# Altium PCB PCB1.PcbDoc (part 1 of 2)
Units mm, origin at the board's own origin, x right, y up, seen from the top; angles counter-clockwise.
Board outline 100.2 x 69.85 mm, 2 copper layers (Top Layer, Bottom Layer); 190 components, 160 nets, 546 pads, 233 vias.
Unrouted connection lines stored in the file: 15.
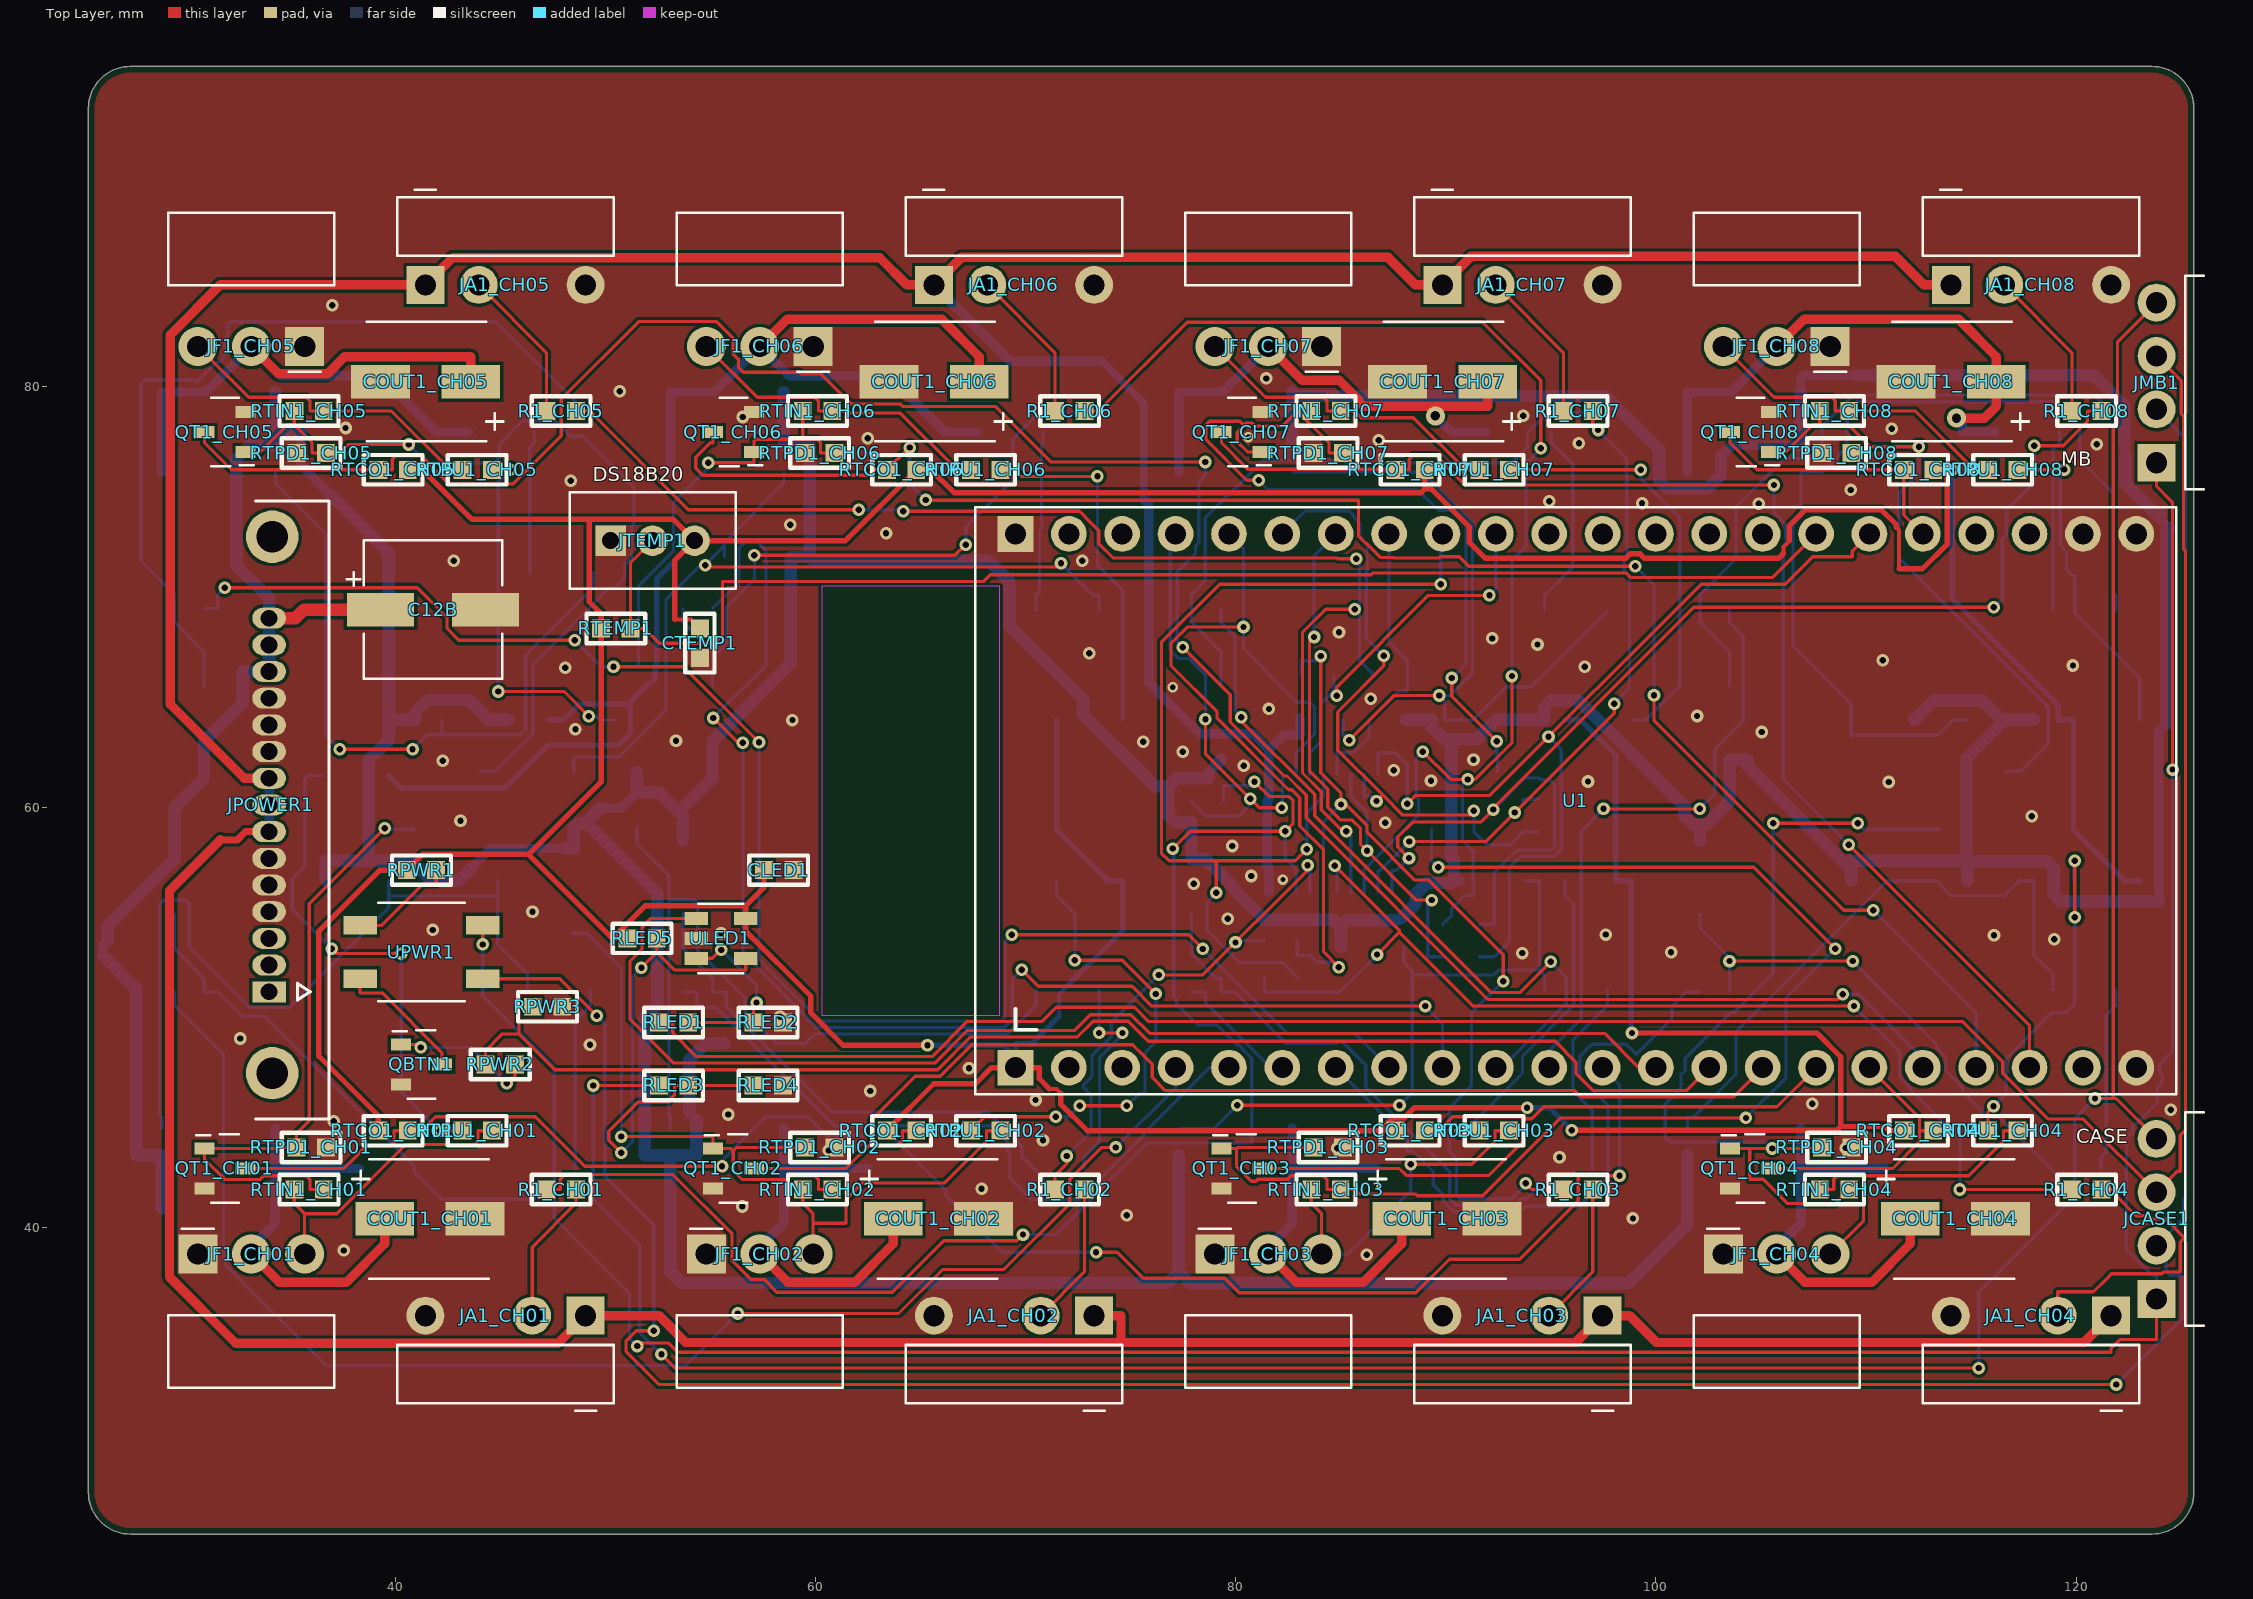
[diagram p0: Top Layer view]
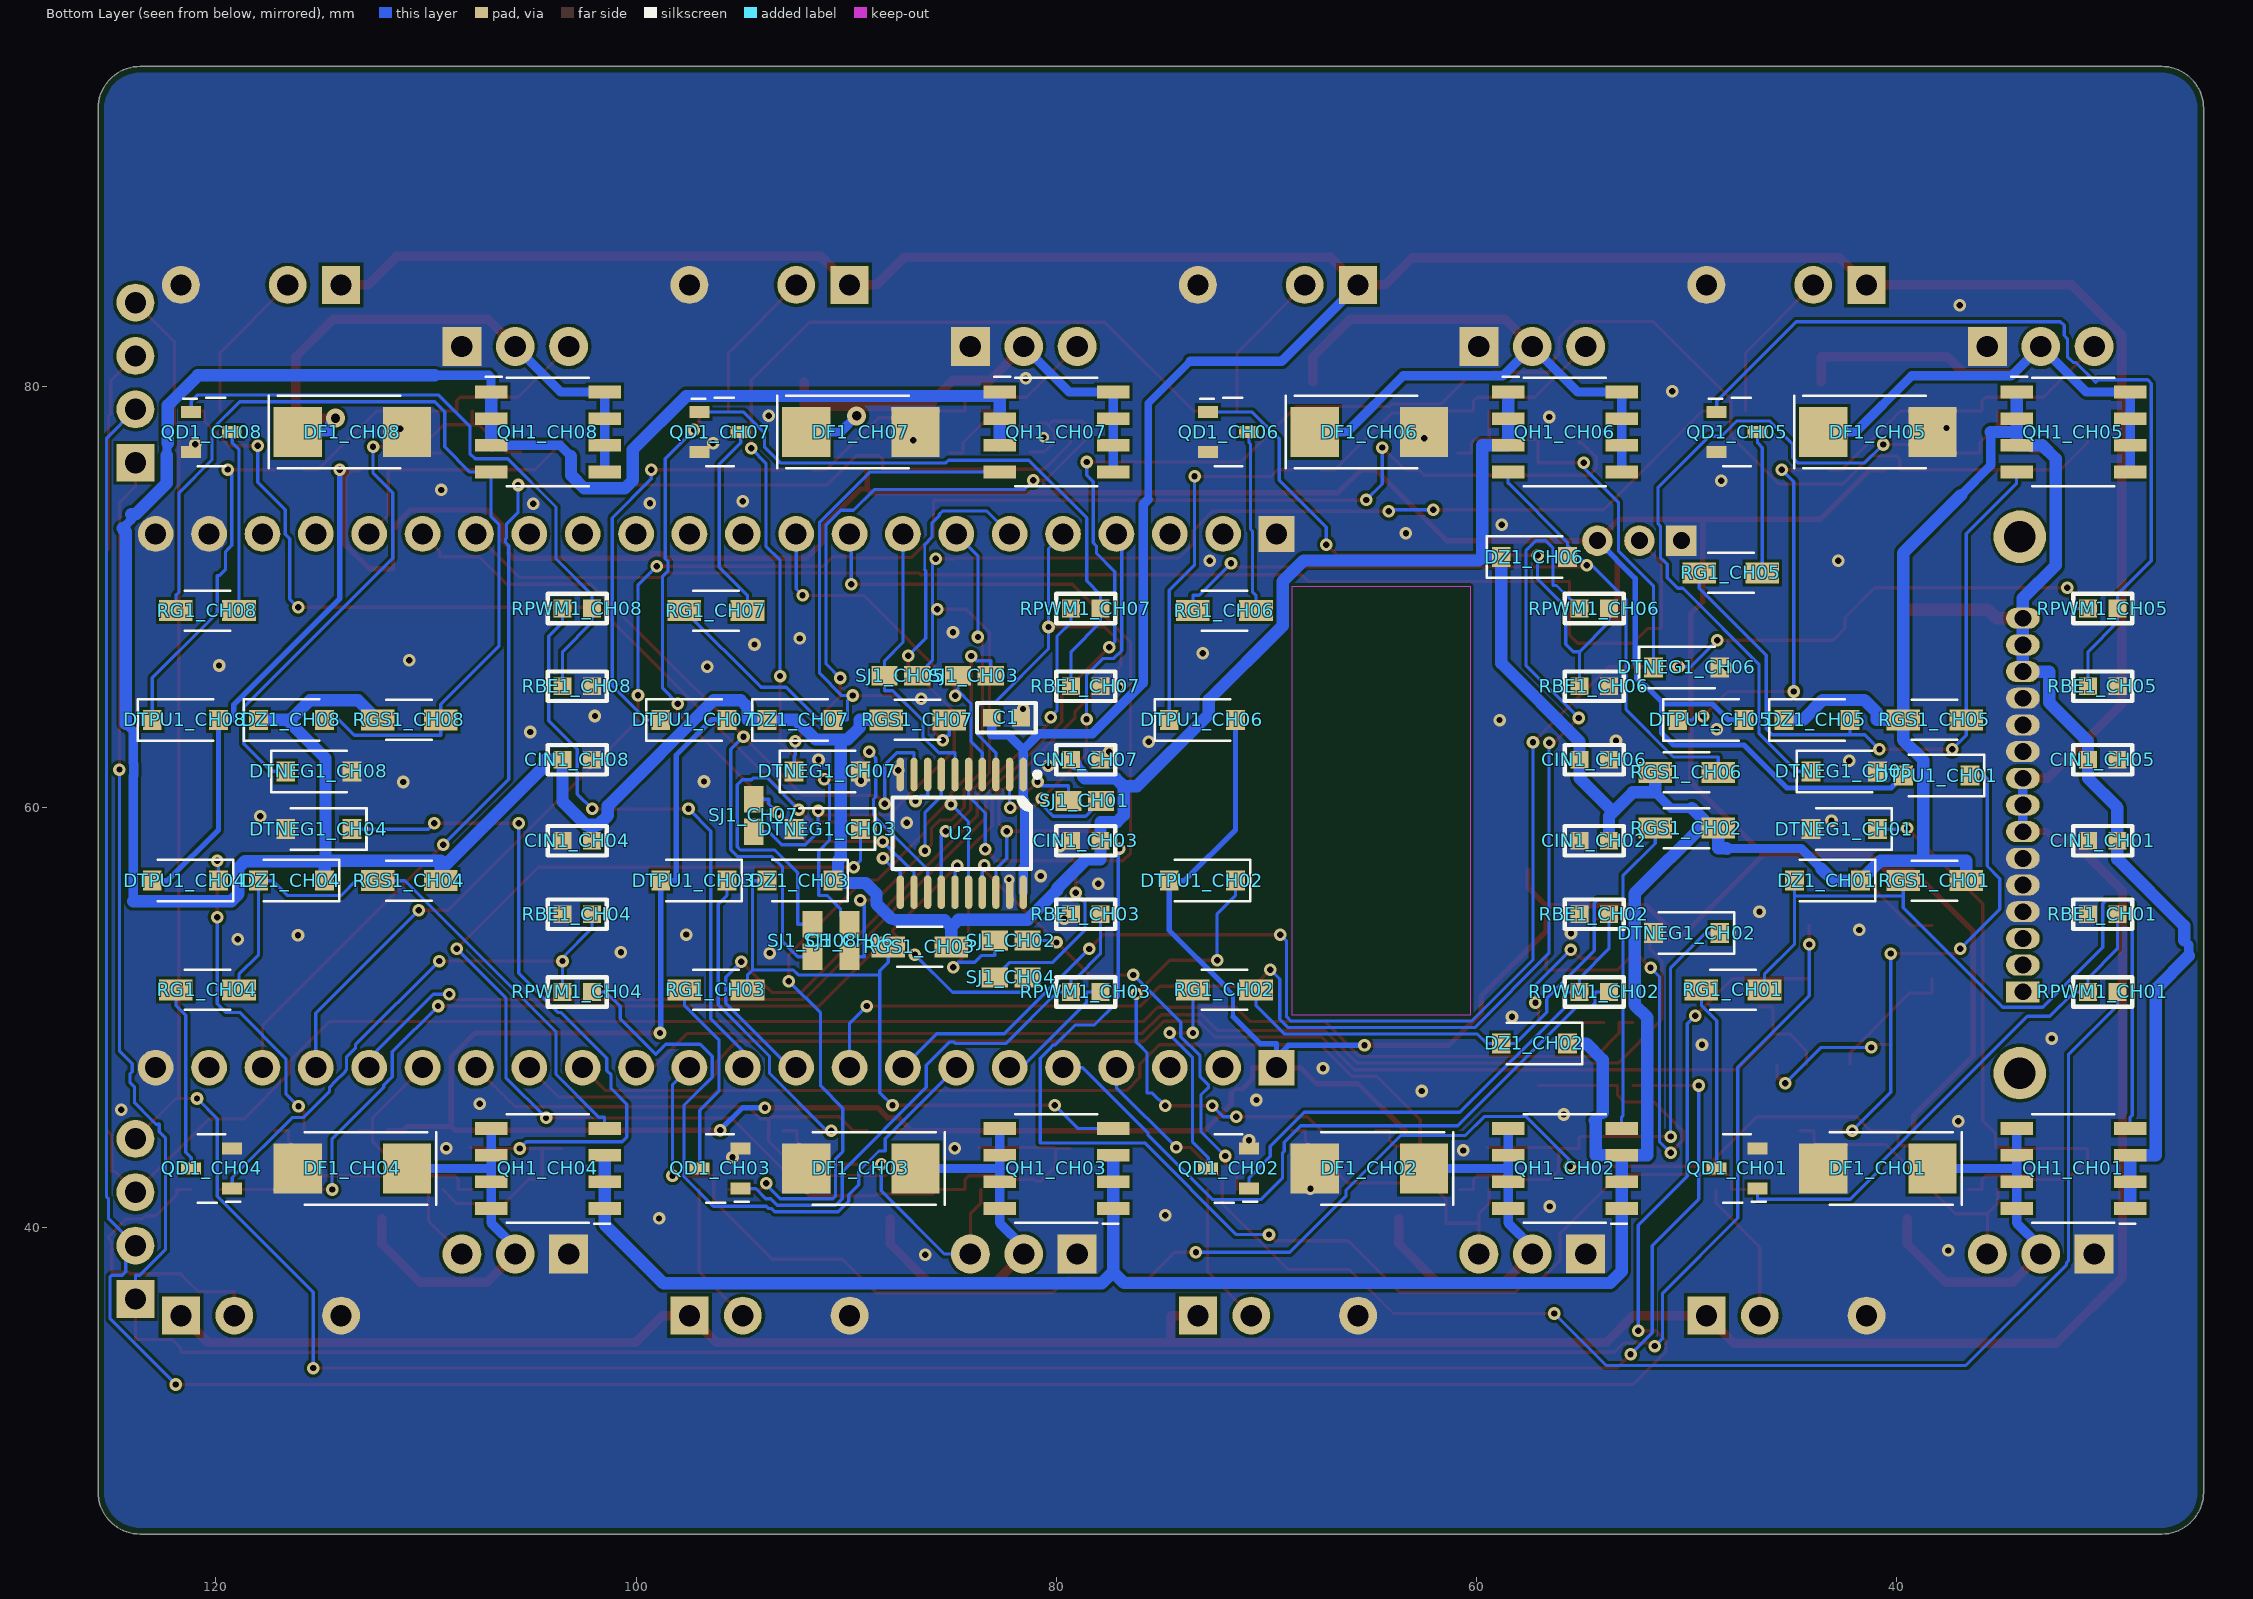
[diagram p1: Bottom Layer view, seen from below]
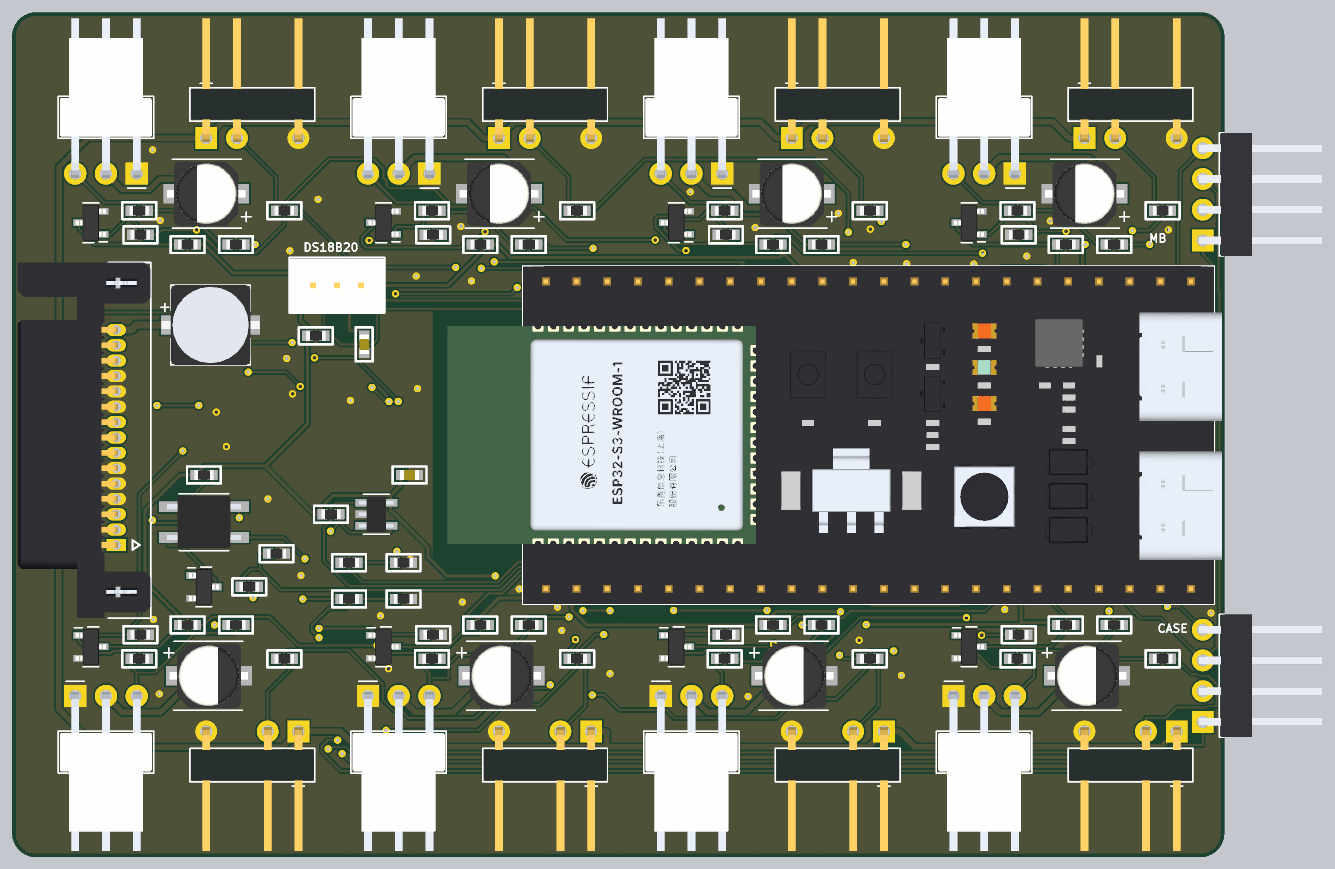
[diagram p3: 3D render of the assembled board from above, using the file's embedded part models]
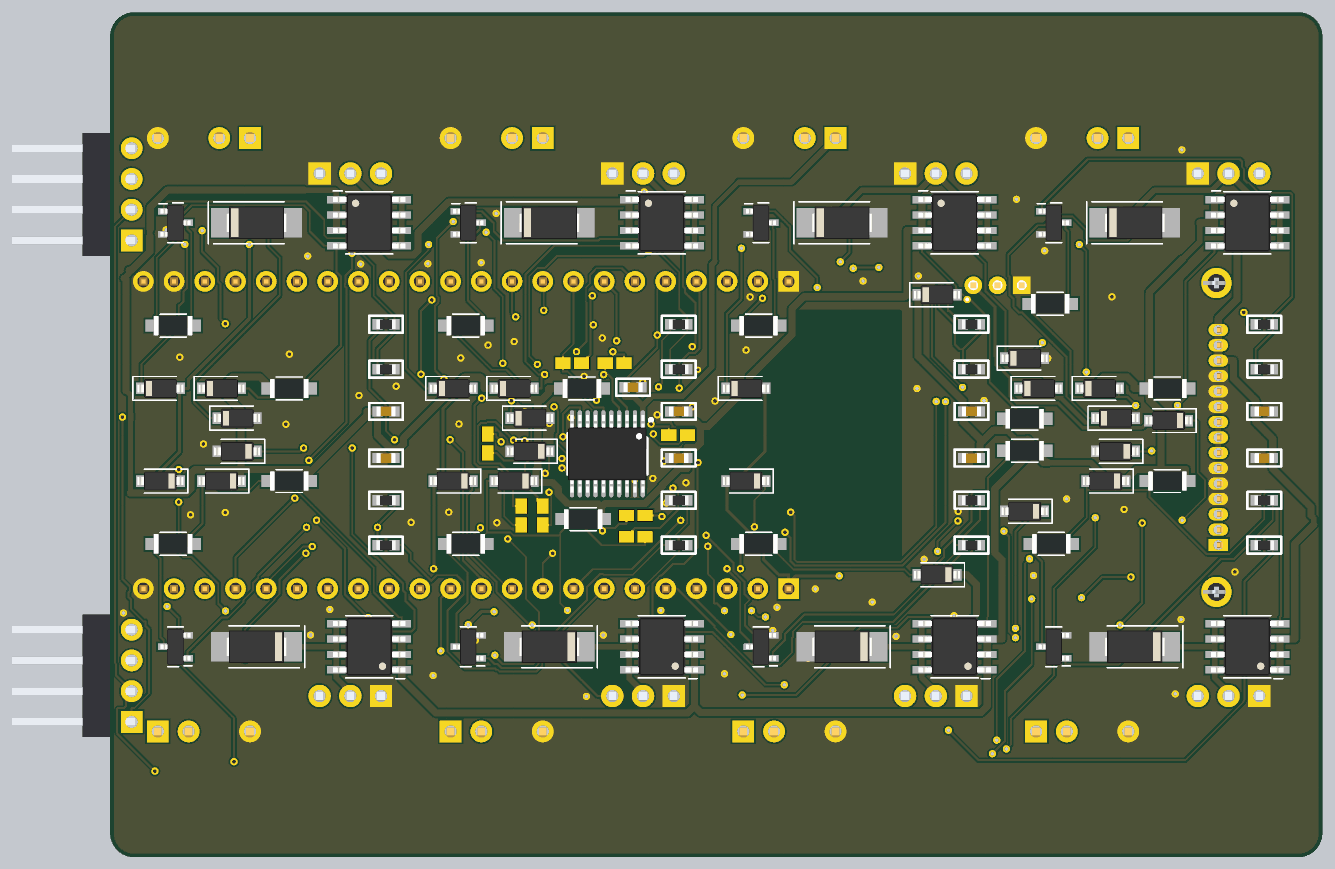
[diagram p4: 3D render of the assembled board from below, using the file's embedded part models]

## Layer stack, top to bottom
Top Solder: solder mask 0.0102, Solder Resist, Dk 3.5
Top Layer: signal copper 0.0356
Dielectric 1: dielectric 0.32, FR-4, Dk 4.8
Bottom Layer: signal copper 0.0356
Bottom Solder: solder mask 0.0102, Solder Resist, Dk 3.5

## Board outline
27.4,25.4 123.6,25.4 ccw(c123.6,27.4) 125.6,27.4 125.6,93.25 ccw(c123.6,93.25) 123.6,95.25 27.4,95.25 ccw(c27.4,93.25) 25.4,93.25 25.4,27.4 ccw(c27.4,27.4)

## Design rules (kind name [scope] priority, off if disabled: settings)
Clearance [All] p1: gap=0.152 ignorepadtopadclearanceinfootprint=FALSE
MinimumSolderMaskSliver [All] p1: minsoldermaskwidth=0.1
PolygonConnect [All] p1: connectstyle=Direct reliefconductorwidth=0.254 reliefentries=4 polygonreliefangle="90 Angle" airgapwidth=0.254
RoutingVias FrontIO_Vias [InNet('+3V3_AUX') Or InNet('PC_LED_VM') Or InNet('PC_LED_VP') Or InNet('PC_PLED_A') Or InNet('PC_PLED_K') Or InNet('PC_SW_A') Or InNet('PC_SW_B')] p1: holewidth=0.3 width=0.6 viastyle="Through Hole" minholewidth=0.25 minwidth=0.5 maxholewidth=0.45 maxwidth=0.9 // Through vias for front panel and temperature sense
RoutingVias [All] p2: holewidth=0.3 width=0.6 viastyle="Through Hole" minholewidth=0.25 minwidth=0.5 maxholewidth=0.45 maxwidth=0.9
SilkToSolderMaskClearance [IsPad] p1: minsilkscreentomaskgap=0.15 clearancetoexposedcopper=TRUE
SolderMaskExpansion [All] p1: expansion=0 istentingtop=FALSE
Width [All] p1: maxlimit=3 minlimit=0.115 preferedwidth=0.254 minimp=50.000000 maximp=50.000000 favimp=50.000000
28 further rules are at their usual default settings.

## Components (designator, comment, footprint, x,y, rotation, side; value= is the part's Value field where it differs from the comment)
C1 "100n / U2" CH0603C 82.375,64.25 r180 bottom
C12B "47u / 35V" EEE_FK_D_6X6 41.8,69.4 r0 top
CIN1_CH01 "100n / 50V" CH0603C 30.2,58.4 r0 bottom (schematic designator CIN1)
CIN1_CH02 "100n / 50V" CH0603C 54.4,58.4 r0 bottom (schematic designator CIN1)
CIN1_CH03 "100n / 50V" CH0603C 78.6,58.4 r0 bottom (schematic designator CIN1)
CIN1_CH04 "100n / 50V" CH0603C 102.8,58.4 r0 bottom (schematic designator CIN1)
CIN1_CH05 "100n / 50V" CH0603C 30.2,62.25 r180 bottom (schematic designator CIN1)
CIN1_CH06 "100n / 50V" CH0603C 54.4,62.25 r180 bottom (schematic designator CIN1)
CIN1_CH07 "100n / 50V" CH0603C 78.6,62.25 r180 bottom (schematic designator CIN1)
CIN1_CH08 "100n / 50V" CH0603C 102.8,62.25 r180 bottom (schematic designator CIN1)
CLED1 "100n" CH0603C 58.25,57 r0 top
COUT1_CH01 "10u/35V DNP" EEE_FK_5x5_8 41.655,40.4 r0 top (schematic designator COUT1)
COUT1_CH02 "10u/35V DNP" EEE_FK_5x5_8 65.855,40.4 r0 top (schematic designator COUT1)
COUT1_CH03 "10u/35V DNP" EEE_FK_5x5_8 90.055,40.4 r0 top (schematic designator COUT1)
COUT1_CH04 "10u/35V DNP" EEE_FK_5x5_8 114.255,40.4 r0 top (schematic designator COUT1)
COUT1_CH05 "10u/35V DNP" EEE_FK_5x5_8 41.445,80.25 r180 top (schematic designator COUT1)
COUT1_CH06 "10u/35V DNP" EEE_FK_5x5_8 65.645,80.25 r180 top (schematic designator COUT1)
COUT1_CH07 "10u/35V DNP" EEE_FK_5x5_8 89.845,80.25 r180 top (schematic designator COUT1)
COUT1_CH08 "10u/35V DNP" EEE_FK_5x5_8 114.045,80.25 r180 top (schematic designator COUT1)
CTEMP1 "100n" CH0603C 54.5,67.8 r270 top
DF1_CH01 "B340A-LS / SMA" B340ALS_DIODES_SMA 40.9,42.8 r0 bottom (schematic designator DF1)
DF1_CH02 "B340A-LS / SMA" B340ALS_DIODES_SMA 65.1,42.8 r0 bottom (schematic designator DF1)
DF1_CH03 "B340A-LS / SMA" B340ALS_DIODES_SMA 89.3,42.8 r0 bottom (schematic designator DF1)
DF1_CH04 "B340A-LS / SMA" B340ALS_DIODES_SMA 113.5,42.8 r0 bottom (schematic designator DF1)
DF1_CH05 "B340A-LS / SMA" B340ALS_DIODES_SMA 40.9,77.85 r180 bottom (schematic designator DF1)
DF1_CH06 "B340A-LS / SMA" B340ALS_DIODES_SMA 65.1,77.85 r180 bottom (schematic designator DF1)
DF1_CH07 "B340A-LS / SMA" B340ALS_DIODES_SMA 89.3,77.85 r180 bottom (schematic designator DF1)
DF1_CH08 "B340A-LS / SMA" B340ALS_DIODES_SMA 113.5,77.85 r180 bottom (schematic designator DF1)
DTNEG1_CH01 "1N4148W" D_SOD123_DIODESINC 42.5,58.95 r0 bottom (schematic designator DTNEG1)
DTNEG1_CH02 "1N4148W" D_SOD123_DIODESINC 50,54 r0 bottom (schematic designator DTNEG1)
DTNEG1_CH03 "1N4148W" D_SOD123_DIODESINC 90.9,58.95 r0 bottom (schematic designator DTNEG1)
DTNEG1_CH04 "1N4148W" D_SOD123_DIODESINC 115.1,58.95 r0 bottom (schematic designator DTNEG1)
DTNEG1_CH05 "1N4148W" D_SOD123_DIODESINC 42.5,61.7 r180 bottom (schematic designator DTNEG1)
DTNEG1_CH06 "1N4148W" D_SOD123_DIODESINC 50,66.65 r180 bottom (schematic designator DTNEG1)
DTNEG1_CH07 "1N4148W" D_SOD123_DIODESINC 90.9,61.7 r180 bottom (schematic designator DTNEG1)
DTNEG1_CH08 "1N4148W" D_SOD123_DIODESINC 115.1,61.7 r180 bottom (schematic designator DTNEG1)
DTPU1_CH01 "1N4148W" D_SOD123_DIODESINC 38.1,61.5 r0 bottom (schematic designator DTPU1)
DTPU1_CH02 "1N4148W" D_SOD123_DIODESINC 73.05,56.5 r0 bottom (schematic designator DTPU1)
DTPU1_CH03 "1N4148W" D_SOD123_DIODESINC 97.25,56.5 r0 bottom (schematic designator DTPU1)
DTPU1_CH04 "1N4148W" D_SOD123_DIODESINC 121.45,56.5 r0 bottom (schematic designator DTPU1)
DTPU1_CH05 "1N4148W" D_SOD123_DIODESINC 48.85,64.15 r180 bottom (schematic designator DTPU1)
DTPU1_CH06 "1N4148W" D_SOD123_DIODESINC 73.05,64.15 r180 bottom (schematic designator DTPU1)
DTPU1_CH07 "1N4148W" D_SOD123_DIODESINC 97.25,64.15 r180 bottom (schematic designator DTPU1)
DTPU1_CH08 "1N4148W" D_SOD123_DIODESINC 121.45,64.15 r180 bottom (schematic designator DTPU1)
DZ1_CH01 "BZT52C12" D_SOD123_DIODESINC 43.3,56.5 r0 bottom (schematic designator DZ1)
DZ1_CH02 "BZT52C12" D_SOD123_DIODESINC 57.25,48.75 r0 bottom (schematic designator DZ1)
DZ1_CH03 "BZT52C12" D_SOD123_DIODESINC 92.2,56.5 r0 bottom (schematic designator DZ1)
DZ1_CH04 "BZT52C12" D_SOD123_DIODESINC 116.4,56.5 r0 bottom (schematic designator DZ1)
DZ1_CH05 "BZT52C12" D_SOD123_DIODESINC 43.8,64.15 r180 bottom (schematic designator DZ1)
DZ1_CH06 "BZT52C12" D_SOD123_DIODESINC 57.25,71.9 r180 bottom (schematic designator DZ1)
DZ1_CH07 "BZT52C12" D_SOD123_DIODESINC 92.2,64.15 r180 bottom (schematic designator DZ1)
DZ1_CH08 "BZT52C12" D_SOD123_DIODESINC 116.4,64.15 r180 bottom (schematic designator DZ1)
JA1_CH01 "ARGB 5V / 1-2-x-4 RA" TSW_104_08_S_RA_003_ARGB 45.25,35.8 r0 top (schematic designator JA1)
JA1_CH02 "ARGB 5V / 1-2-x-4 RA" TSW_104_08_S_RA_003_ARGB 69.45,35.8 r0 top (schematic designator JA1)
JA1_CH03 "ARGB 5V / 1-2-x-4 RA" TSW_104_08_S_RA_003_ARGB 93.65,35.8 r0 top (schematic designator JA1)
JA1_CH04 "ARGB 5V / 1-2-x-4 RA" TSW_104_08_S_RA_003_ARGB 117.85,35.8 r0 top (schematic designator JA1)
JA1_CH05 "ARGB 5V / 1-2-x-4 RA" TSW_104_08_S_RA_003_ARGB 45.25,84.85 r180 top (schematic designator JA1)
JA1_CH06 "ARGB 5V / 1-2-x-4 RA" TSW_104_08_S_RA_003_ARGB 69.45,84.85 r180 top (schematic designator JA1)
JA1_CH07 "ARGB 5V / 1-2-x-4 RA" TSW_104_08_S_RA_003_ARGB 93.65,84.85 r180 top (schematic designator JA1)
JA1_CH08 "ARGB 5V / 1-2-x-4 RA" TSW_104_08_S_RA_003_ARGB 117.85,84.85 r180 top (schematic designator JA1)
JCASE1 "CASE FRONT PANEL" TSW_104_08_S_RA 123.825,40.4 r0 top
JF1_CH01 "FAN 12V / 3-pin RA" Molex_22053031_RA 33.15,38.73 r0 top (schematic designator JF1)
JF1_CH02 "FAN 12V / 3-pin RA" Molex_22053031_RA 57.35,38.73 r0 top (schematic designator JF1)
JF1_CH03 "FAN 12V / 3-pin RA" Molex_22053031_RA 81.55,38.73 r0 top (schematic designator JF1)
JF1_CH04 "FAN 12V / 3-pin RA" Molex_22053031_RA 105.75,38.73 r0 top (schematic designator JF1)
JF1_CH05 "FAN 12V / 3-pin RA" Molex_22053031_RA 33.15,81.92 r180 top (schematic designator JF1)
JF1_CH06 "FAN 12V / 3-pin RA" Molex_22053031_RA 57.35,81.92 r180 top (schematic designator JF1)
JF1_CH07 "FAN 12V / 3-pin RA" Molex_22053031_RA 81.55,81.92 r180 top (schematic designator JF1)
JF1_CH08 "FAN 12V / 3-pin RA" Molex_22053031_RA 105.75,81.92 r180 top (schematic designator JF1)
JMB1 "MOTHERBOARD F_PANEL" TSW_104_08_S_RA 123.825,80.2 r0 top
JPOWER1 "SATA POWER 15P - PSU input" CSAT-M15RD30-PB 34,60.1 r270 top
JTEMP1 "DS18B20" B3B_PH_K_S_1X03 52.25,72.68 r0 top
QBTN1 "MMBT3904" MMBT3904_SOT23 41.25,47.75 r0 top
QD1_CH01 "MMBT3904" MMBT3904_SOT23 47.6,42.8 r0 bottom (schematic designator QD1)
QD1_CH02 "MMBT3904" MMBT3904_SOT23 71.8,42.8 r0 bottom (schematic designator QD1)
QD1_CH03 "MMBT3904" MMBT3904_SOT23 96,42.8 r0 bottom (schematic designator QD1)
QD1_CH04 "MMBT3904" MMBT3904_SOT23 120.2,42.8 r0 bottom (schematic designator QD1)
QD1_CH05 "MMBT3904" MMBT3904_SOT23 47.6,77.85 r180 bottom (schematic designator QD1)
QD1_CH06 "MMBT3904" MMBT3904_SOT23 71.8,77.85 r180 bottom (schematic designator QD1)
QD1_CH07 "MMBT3904" MMBT3904_SOT23 96,77.85 r180 bottom (schematic designator QD1)
QD1_CH08 "MMBT3904" MMBT3904_SOT23 120.2,77.85 r180 bottom (schematic designator QD1)
QH1_CH01 "DMP6023LSS / SO-8" DMP6023LSS_SO8 31.6,42.8 r0 bottom (schematic designator QH1)
QH1_CH02 "DMP6023LSS / SO-8" DMP6023LSS_SO8 55.8,42.8 r0 bottom (schematic designator QH1)
QH1_CH03 "DMP6023LSS / SO-8" DMP6023LSS_SO8 80,42.8 r0 bottom (schematic designator QH1)
QH1_CH04 "DMP6023LSS / SO-8" DMP6023LSS_SO8 104.2,42.8 r0 bottom (schematic designator QH1)
QH1_CH05 "DMP6023LSS / SO-8" DMP6023LSS_SO8 31.6,77.85 r180 bottom (schematic designator QH1)
QH1_CH06 "DMP6023LSS / SO-8" DMP6023LSS_SO8 55.8,77.85 r180 bottom (schematic designator QH1)
QH1_CH07 "DMP6023LSS / SO-8" DMP6023LSS_SO8 80,77.85 r180 bottom (schematic designator QH1)
QH1_CH08 "DMP6023LSS / SO-8" DMP6023LSS_SO8 104.2,77.85 r180 bottom (schematic designator QH1)
QT1_CH01 "MMBT3904" MMBT3904_SOT23 31.9,42.8 r0 top (schematic designator QT1)
QT1_CH02 "MMBT3904" MMBT3904_SOT23 56.1,42.8 r0 top (schematic designator QT1)
QT1_CH03 "MMBT3904" MMBT3904_SOT23 80.3,42.8 r0 top (schematic designator QT1)
QT1_CH04 "MMBT3904" MMBT3904_SOT23 104.5,42.8 r0 top (schematic designator QT1)
QT1_CH05 "MMBT3904" MMBT3904_SOT23 31.9,77.85 r180 top (schematic designator QT1)
QT1_CH06 "MMBT3904" MMBT3904_SOT23 56.1,77.85 r180 top (schematic designator QT1)
QT1_CH07 "MMBT3904" MMBT3904_SOT23 80.3,77.85 r180 top (schematic designator QT1)
QT1_CH08 "MMBT3904" MMBT3904_SOT23 104.5,77.85 r180 top (schematic designator QT1)
R1_CH01 "330R candidate" CH0603R 47.9,41.8 r0 top (schematic designator R1)
R1_CH02 "330R candidate" CH0603R 72.1,41.8 r0 top (schematic designator R1)
R1_CH03 "330R candidate" CH0603R 96.3,41.8 r0 top (schematic designator R1)
R1_CH04 "330R candidate" CH0603R 120.5,41.8 r0 top (schematic designator R1)
R1_CH05 "330R candidate" CH0603R 47.9,78.85 r180 top (schematic designator R1)
R1_CH06 "330R candidate" CH0603R 72.1,78.85 r180 top (schematic designator R1)
R1_CH07 "330R candidate" CH0603R 96.3,78.85 r180 top (schematic designator R1)
R1_CH08 "330R candidate" CH0603R 120.5,78.85 r180 top (schematic designator R1)
RBE1_CH01 "100k" CH0603R 30.2,54.9 r0 bottom (schematic designator RBE1)
RBE1_CH02 "100k" CH0603R 54.4,54.9 r0 bottom (schematic designator RBE1)
RBE1_CH03 "100k" CH0603R 78.6,54.9 r0 bottom (schematic designator RBE1)
RBE1_CH04 "100k" CH0603R 102.8,54.9 r0 bottom (schematic designator RBE1)
RBE1_CH05 "100k" CH0603R 30.2,65.75 r180 bottom (schematic designator RBE1)
RBE1_CH06 "100k" CH0603R 54.4,65.75 r180 bottom (schematic designator RBE1)
RBE1_CH07 "100k" CH0603R 78.6,65.75 r180 bottom (schematic designator RBE1)
RBE1_CH08 "100k" CH0603R 102.8,65.75 r180 bottom (schematic designator RBE1)
RG1_CH01 "1k / 0.25W" CH1206R 47.8,51.3 r0 bottom (schematic designator RG1)
RG1_CH02 "1k / 0.25W" CH1206R 72,51.3 r0 bottom (schematic designator RG1)
RG1_CH03 "1k / 0.25W" CH1206R 96.2,51.3 r0 bottom (schematic designator RG1)
RG1_CH04 "1k / 0.25W" CH1206R 120.4,51.3 r0 bottom (schematic designator RG1)
RG1_CH05 "1k / 0.25W" CH1206R 47.9,71.15 r180 bottom (schematic designator RG1)
RG1_CH06 "1k / 0.25W" CH1206R 72,69.35 r180 bottom (schematic designator RG1)
RG1_CH07 "1k / 0.25W" CH1206R 96.2,69.35 r180 bottom (schematic designator RG1)
RG1_CH08 "1k / 0.25W" CH1206R 120.4,69.35 r180 bottom (schematic designator RG1)
RGS1_CH01 "10k / 0.25W" CH1206R 38.2,56.5 r0 bottom (schematic designator RGS1)
RGS1_CH02 "10k / 0.25W" CH1206R 50,59 r0 bottom (schematic designator RGS1)
RGS1_CH03 "10k / 0.25W" CH1206R 86.5,53.35 r0 bottom (schematic designator RGS1)
RGS1_CH04 "10k / 0.25W" CH1206R 110.8,56.5 r0 bottom (schematic designator RGS1)
RGS1_CH05 "10k / 0.25W" CH1206R 38.2,64.15 r180 bottom (schematic designator RGS1)
RGS1_CH06 "10k / 0.25W" CH1206R 50,61.65 r180 bottom (schematic designator RGS1)
RGS1_CH07 "10k / 0.25W" CH1206R 86.6,64.15 r180 bottom (schematic designator RGS1)
RGS1_CH08 "10k / 0.25W" CH1206R 110.8,64.15 r180 bottom (schematic designator RGS1)
RLED1 "330k 1%" CH0603R 53.25,49.75 r0 top
RLED2 "220k 1%" CH0603R 57.75,49.75 r0 top
RLED3 "330k 1%" CH0603R 53.25,46.75 r0 top
RLED4 "240k 1%" CH0603R 57.75,46.75 r0 top
RLED5 "2.2M 1%" CH0603R 51.75,53.75 r0 top
RPWM1_CH01 "1k" CH0603R 30.2,51.2 r0 bottom (schematic designator RPWM1)
RPWM1_CH02 "1k" CH0603R 54.4,51.2 r0 bottom (schematic designator RPWM1)
RPWM1_CH03 "1k" CH0603R 78.6,51.2 r0 bottom (schematic designator RPWM1)
RPWM1_CH04 "1k" CH0603R 102.8,51.2 r0 bottom (schematic designator RPWM1)
RPWM1_CH05 "1k" CH0603R 30.2,69.45 r180 bottom (schematic designator RPWM1)
RPWM1_CH06 "1k" CH0603R 54.4,69.45 r180 bottom (schematic designator RPWM1)
RPWM1_CH07 "1k" CH0603R 78.6,69.45 r180 bottom (schematic designator RPWM1)
RPWM1_CH08 "1k" CH0603R 102.8,69.45 r180 bottom (schematic designator RPWM1)
RPWR1 "220R" CH0603R 41.25,57 r0 top
RPWR2 "3.3k" CH0603R 45,47.75 r0 top
RPWR3 "100k" CH0603R 47.25,50.5 r0 top
RTCO1_CH01 "47k" CH0603R 39.9,44.6 r0 top (schematic designator RTCO1)
RTCO1_CH02 "47k" CH0603R 64.1,44.6 r0 top (schematic designator RTCO1)
RTCO1_CH03 "47k" CH0603R 88.3,44.6 r0 top (schematic designator RTCO1)
RTCO1_CH04 "47k" CH0603R 112.5,44.6 r0 top (schematic designator RTCO1)
RTCO1_CH05 "47k" CH0603R 39.9,76.05 r180 top (schematic designator RTCO1)
RTCO1_CH06 "47k" CH0603R 64.1,76.05 r180 top (schematic designator RTCO1)
RTCO1_CH07 "47k" CH0603R 88.3,76.05 r180 top (schematic designator RTCO1)
RTCO1_CH08 "47k" CH0603R 112.5,76.05 r180 top (schematic designator RTCO1)
RTEMP1 "4.7k" CH0603R 50.5,68.5 r0 top
RTIN1_CH01 "47k" CH0603R 35.9,41.8 r0 top (schematic designator RTIN1)
RTIN1_CH02 "47k" CH0603R 60.1,41.8 r0 top (schematic designator RTIN1)
RTIN1_CH03 "47k" CH0603R 84.3,41.8 r0 top (schematic designator RTIN1)
RTIN1_CH04 "47k" CH0603R 108.5,41.8 r0 top (schematic designator RTIN1)
RTIN1_CH05 "47k" CH0603R 35.9,78.85 r180 top (schematic designator RTIN1)
RTIN1_CH06 "47k" CH0603R 60.1,78.85 r180 top (schematic designator RTIN1)
RTIN1_CH07 "47k" CH0603R 84.3,78.85 r180 top (schematic designator RTIN1)
RTIN1_CH08 "47k" CH0603R 108.5,78.85 r180 top (schematic designator RTIN1)
RTPD1_CH01 "100k" CH0603R 36,43.8 r0 top (schematic designator RTPD1)
RTPD1_CH02 "100k" CH0603R 60.2,43.8 r0 top (schematic designator RTPD1)
RTPD1_CH03 "100k" CH0603R 84.4,43.8 r0 top (schematic designator RTPD1)
RTPD1_CH04 "100k" CH0603R 108.6,43.8 r0 top (schematic designator RTPD1)
RTPD1_CH05 "100k" CH0603R 36,76.85 r180 top (schematic designator RTPD1)
RTPD1_CH06 "100k" CH0603R 60.2,76.85 r180 top (schematic designator RTPD1)
RTPD1_CH07 "100k" CH0603R 84.4,76.85 r180 top (schematic designator RTPD1)
RTPD1_CH08 "100k" CH0603R 108.6,76.85 r180 top (schematic designator RTPD1)
RTPU1_CH01 "10k DNP" CH0603R 43.9,44.6 r0 top (schematic designator RTPU1)
RTPU1_CH02 "10k DNP" CH0603R 68.1,44.6 r0 top (schematic designator RTPU1)
RTPU1_CH03 "10k DNP" CH0603R 92.3,44.6 r0 top (schematic designator RTPU1)
RTPU1_CH04 "10k DNP" CH0603R 116.5,44.6 r0 top (schematic designator RTPU1)
RTPU1_CH05 "10k DNP" CH0603R 43.9,76.05 r180 top (schematic designator RTPU1)
RTPU1_CH06 "10k DNP" CH0603R 68.1,76.05 r180 top (schematic designator RTPU1)
RTPU1_CH07 "10k DNP" CH0603R 92.3,76.05 r180 top (schematic designator RTPU1)
RTPU1_CH08 "10k DNP" CH0603R 116.5,76.05 r180 top (schematic designator RTPU1)
SJ1_CH01 "OPEN" SJ_RECT_125X095_G030 78.65,60.3 r0 bottom (schematic designator SJ1)
SJ1_CH02 "OPEN" SJ_RECT_125X095_G030 82.15,53.65 r180 bottom (schematic designator SJ1)
SJ1_CH03 "OPEN" SJ_RECT_125X095_G030 83.9,66.25 r180 bottom (schematic designator SJ1)
SJ1_CH04 "OPEN" SJ_RECT_125X095_G030 82.15,51.9 r180 bottom (schematic designator SJ1)
SJ1_CH05 "OPEN" SJ_RECT_125X095_G030 87.4,66.25 r180 bottom (schematic designator SJ1)
SJ1_CH06 "OPEN" SJ_RECT_125X095_G030 89.85,53.65 r90 bottom (schematic designator SJ1)
SJ1_CH07 "OPEN" SJ_RECT_125X095_G030 94.4,59.6 r90 bottom (schematic designator SJ1)
SJ1_CH08 "OPEN" SJ_RECT_125X095_G030 91.6,53.65 r90 bottom (schematic designator SJ1)
U1 "ESP32-S3 DEVBOARD - UNVERIFIED" YD-ESP32-S3_44P_25.40MM 96.191,60.3 r90 top
U2 "SN74AHCT245 OPTIONAL / DNP" "TI TSSOP-20 PW" 84.5,58.75 r270 bottom
ULED1 "MCP6541T-I/OT" SOT23_5_AUX 55.5,53.75 r0 top
UPWR1 "AQY212GS" AQY212GS_SOP4 41.25,53.1 r0 top

## Footprints (in the part's own frame and the unit in brackets; to place one, negate y for a bottom-side part, rotate by r counter-clockwise, add the part's x,y. Pads: shape width x height; smd on the part's side, far side on the other; paste and mask are expansions set on the pad)
AQY212GS_SOP4 [mm] "Panasonic AQY212GS, four leads"
  rect 1.6x0.88 smd: 1(-2.92,1.27) 2(-2.92,-1.27) 3(2.92,-1.27) 4(2.92,1.27)
  silkscreen extent -2.05,-2.35 2.05,2.35, body extent -3.05,-2.15 3.05,2.15, height 2.19
B3B_PH_K_S_1X03 [mm] "JST PH 2 mm vertical, B3B-PH-K-S"
  rect 1.45x1.45 hole 0.8: 1(-2,0)
  round 1.45 hole 0.8: 2(0,0) 3(2,0)
  silkscreen extent -3.95,-2.3 3.95,2.3, body extent -3.95,-2.3 3.95,2.2, height 6
B340ALS_DIODES_SMA [mm] "Diodes Inc B340A-LS 40V 3A SMA Schottky, K1 A2"
  rect 2.3x2.4 smd: 1(-2.6,0) 2(2.6,0)
  silkscreen extent -3.98,-1.73 2.28,1.73, body extent -2.5,-1.35 2.5,1.35, height 2.22
CH0603C [mm] "Chip Capacitor, 2-Leads, Body 1,53x0,85mm, IPC Medium Density"
  rect 0.85x0.85 smd: 1(-0.7,0) 2(0.7,0)
  silkscreen extent -1.4,-0.7 1.4,0.7, body extent -0.8,-0.4 0.8,0.4, height 0.9
CH0603R [mm]
  rect 0.85x0.85 smd: 1(-0.7,0) 2(0.7,0)
  silkscreen extent -1.4,-0.7 1.4,0.7, body extent -0.8,-0.4 0.8,0.4, height 0.4
CH1206R [mm] "1206 resistor, existing NotOnlyFans CH1206R land"
  rect 1.6x1 smd: 1(-1.5,0) 2(1.5,0)
  silkscreen extent -1.08,-0.95 1.08,0.95, body extent -1.6,-0.8 1.6,0.8, height 0.55
CSAT-M15RD30-PB [mm] "Conn-Link SATA Power 15P male RA DIP; drawing CSAT-M07-H0B Rev A, PCB 1.60 mm"
  rect 1x1.6 hole 0.8: 1(8.89,0)
  oval 1x1.6 hole 0.8: 2(7.62,0) 3(6.35,0) 4(5.08,0) 5(3.81,0) 6(2.54,0) 7(1.27,0) 8(0,0) 9(-1.27,0) 10(-2.54,0) 11(-3.81,0) 12(-5.08,0) 13(-6.35,0) 14(-7.62,0) 15(-8.89,0)
  round 2.5 hole 1.5: MP1(12.765,0.15) MP2(-12.765,0.15)
  silkscreen extent -14.46,-0.65 14.93,2.85, body extent -14.47,-8.16 14.93,2.85, height 4
D_SOD123_DIODESINC [mm] "Diodes Incorporated SOD-123; cathode pad 1"
  rect 0.9x0.95 smd: 1(-1.575,0) 2(1.575,0)
  silkscreen extent -2.27,-0.99 1.32,0.99, body extent -1.9,-0.8 1.9,0.8, height 1.25
DMP6023LSS_SO8 [mm] "DMP6023LSS-13 P-MOS -60V, S1-3 G4 D5-8, SO-8"
  rect 1.55x0.6 smd: 1(-2.7,1.905) 2(-2.7,0.635) 3(-2.7,-0.635) 4(-2.7,-1.905) 5(2.7,-1.905) 6(2.7,-0.635) 7(2.7,0.635) 8(2.7,1.905)
  silkscreen extent -2.95,-2.58 1.95,2.63, body extent -3,-2.45 3,2.45, height 1.75
EEE_FK_5x5_8 [mm] "Panasonic EEE-FK size C, dia. 5 x 5.8 mm; positive pad 1"
  rect 2.8x1.6 smd: 1(-2.15,0) 2(2.15,0)
  silkscreen extent -3.7,-2.85 2.8,2.85, body extent -3.25,-2.65 3.25,2.65, height 5.8
EEE_FK_D_6X6 [mm] "Panasonic EEE-FK1V470P case D / 6.3 mm, 47uF / 35V"
  rect 3.2x1.6 smd: 1(-2.5,0) 2(2.5,0)
  silkscreen extent -4.1,-3.3 3.3,3.3, body extent -4.05,-3.3 4.05,3.3, height 5.8
MMBT3904_SOT23 [mm] "onsemi SOT-23 case 318; base 1, emitter 2, collector 3"
  rect 0.95x0.56 smd: 1(-0.975,0.95) 2(-0.975,-0.95) 3(0.975,0)
  silkscreen extent -1.36,-1.64 0.65,1.64, body extent -1.25,-1.5 1.25,1.5, height 1.2
Molex_22053031_RA [mm] "Molex 22-05-3031 KK254 Series 7478, 3 circuit right-angle THT"
  rect 1.85x1.85 hole 1.016: 1(-2.54,0)
  round 1.85 hole 1.016: 2(0,0) 3(2.54,0)
  silkscreen extent -3.95,-6.37 3.95,1.2, body extent -3.81,-12.83 3.81,0.32, height 6.35
SJ_RECT_125X095_G030 [mm] "Normally open solder bridge, 0.30 mm copper gap, no paste"
  rect 1.25x0.95 smd paste-1.25 mask+0.055: 1(-0.775,0) 2(0.775,0)
SOT23_5_AUX [mm] "Microchip 5-lead SOT-23"
  rect 1.12x0.63 smd: 1(-1.18,0.95) 2(-1.18,0) 3(-1.18,-0.95) 4(1.18,-0.95) 5(1.18,0.95)
  silkscreen extent -1.07,-1.65 1.07,1.65, body extent -1.44,-1.46 1.44,1.46, height 1.19
"TI TSSOP-20 PW" [mm] "TSSOP, 20-Leads, Body 6.50x4.40mm, Pitch 0.65mm, IPC Medium Density"
  oval 1.6x0.35 smd: 1(-2.8,2.925) 2(-2.8,2.275) 3(-2.8,1.625) 4(-2.8,0.975) 5(-2.8,0.325) 6(-2.8,-0.325) 7(-2.8,-0.975) 8(-2.8,-1.625) 9(-2.8,-2.275) 10(-2.8,-2.925) 11(2.8,-2.925) 12(2.8,-2.275) 13(2.8,-1.625) 14(2.8,-0.975) 15(2.8,-0.325) 16(2.8,0.325) 17(2.8,0.975) 18(2.8,1.625) 19(2.8,2.275) 20(2.8,2.925)
  silkscreen extent -2.92,-3.3 1.7,3.72, body extent -3.21,-3.25 3.21,3.25, height 1.2
TSW_104_08_S_RA [mm] "Samtec TSW-104-08-T-S-RA, horizontal mating 1x4, pitch 2.54 mm"
  rect 1.8x1.8 hole 1.016: 1(0,-3.81)
  round 1.8 hole 1.016: 2(0,-1.27) 3(0,1.27) 4(0,3.81)
  silkscreen extent 1.36,-5.08 2.24,5.08, body extent -0.32,-5.08 9.9,5.08, height 3.02
TSW_104_08_S_RA_003_ARGB [mm] "Samtec TSW-104-08-L-S-RA-003, ARGB 1 / 2 / gap / 4"
  rect 1.8x1.8 hole 1.016: 1(3.81,0)
  round 1.8 hole 1.016: 2(1.27,0) 4(-3.81,0)
  silkscreen extent -5.16,-4.52 5.16,-1.4, body extent -5.08,-9.9 5.08,0.32, height 3.02
YD-ESP32-S3_44P_25.40MM [mm] "YD-ESP32-S3 dual USB-C, 2x22, 2.54 pitch, 25.40 row spacing. VCC-GND-derived land pattern with DevKitC J1/J3 pad designators."
  rect 1.7x1.7 hole 1: J1_1(-12.7,26.67) J3_1(12.7,26.67)
  round 1.7 hole 1: J1_2(-12.7,24.13) J1_3(-12.7,21.59) J1_4(-12.7,19.05) J1_5(-12.7,16.51) J1_6(-12.7,13.97) J1_7(-12.7,11.43) J1_8(-12.7,8.89) J1_9(-12.7,6.35) J1_10(-12.7,3.81) J1_11(-12.7,1.27) J1_12(-12.7,-1.27) J1_13(-12.7,-3.81) J1_14(-12.7,-6.35) J1_15(-12.7,-8.89) J1_16(-12.7,-11.43) J1_17(-12.7,-13.97) J1_18(-12.7,-16.51) J1_19(-12.7,-19.05) J1_20(-12.7,-21.59) J1_21(-12.7,-24.13) J1_22(-12.7,-26.67) J3_2(12.7,24.13) J3_3(12.7,21.59) J3_4(12.7,19.05) J3_5(12.7,16.51) J3_6(12.7,13.97) J3_7(12.7,11.43) J3_8(12.7,8.89) J3_9(12.7,6.35) J3_10(12.7,3.81) J3_11(12.7,1.27) J3_12(12.7,-1.27) J3_13(12.7,-3.81) J3_14(12.7,-6.35) J3_15(12.7,-8.89) J3_16(12.7,-11.43) J3_17(12.7,-13.97) J3_18(12.7,-16.51) J3_19(12.7,-19.05) J3_20(12.7,-21.59) J3_21(12.7,-24.13) J3_22(12.7,-26.67)
  silkscreen extent -13.97,-28.58 13.97,28.57, body extent -13.98,-29.21 13.98,34.82, height 6.81

## Part data
C1 CIN1_CH01 CIN1_CH02 CIN1_CH03 CIN1_CH04 CIN1_CH05 CIN1_CH06 CIN1_CH07 CIN1_CH08: library part Capacitor
C12B: library part EEE-FK1V470P
CLED1 CTEMP1: library part CAP_100n
COUT1_CH01 COUT1_CH02 COUT1_CH03 COUT1_CH04 COUT1_CH05 COUT1_CH06 COUT1_CH07 COUT1_CH08: library part AUTHORED_POLAR_C
DF1_CH01 DF1_CH02 DF1_CH03 DF1_CH04 DF1_CH05 DF1_CH06 DF1_CH07 DF1_CH08: library part AUTHORED_SCHOTTKY
DTNEG1_CH01 DTNEG1_CH02 DTNEG1_CH03 DTNEG1_CH04 DTNEG1_CH05 DTNEG1_CH06 DTNEG1_CH07 DTNEG1_CH08 DTPU1_CH01 DTPU1_CH02 DTPU1_CH03 DTPU1_CH04 DTPU1_CH05 DTPU1_CH06 DTPU1_CH07 DTPU1_CH08: library part AUTHORED_DIODE
DZ1_CH01 DZ1_CH02 DZ1_CH03 DZ1_CH04 DZ1_CH05 DZ1_CH06 DZ1_CH07 DZ1_CH08: library part AUTHORED_ZENER
JA1_CH01 JA1_CH02 JA1_CH03 JA1_CH04 JA1_CH05 JA1_CH06 JA1_CH07 JA1_CH08: library part CUSTOM_ARGB_KEYED
JCASE1 JMB1: library part TSW-104-08-T-S-RA
JF1_CH01 JF1_CH02 JF1_CH03 JF1_CH04 JF1_CH05 JF1_CH06 JF1_CH07 JF1_CH08: library part CUSTOM_FAN_3PIN
JPOWER1: library part CUSTOM_SATA_POWER_15
JTEMP1: library part B3B-PH-K-S(LF)(SN)
QBTN1 QD1_CH01 QD1_CH02 QD1_CH03 QD1_CH04 QD1_CH05 QD1_CH06 QD1_CH07 QD1_CH08 QT1_CH01 QT1_CH02 QT1_CH03 QT1_CH04 QT1_CH05 QT1_CH06 QT1_CH07 QT1_CH08: library part MMBT3904LT1G
QH1_CH01 QH1_CH02 QH1_CH03 QH1_CH04 QH1_CH05 QH1_CH06 QH1_CH07 QH1_CH08: library part DMP6023LSS-13
R1_CH01 R1_CH02 R1_CH03 R1_CH04 R1_CH05 R1_CH06 R1_CH07 R1_CH08 RBE1_CH01 RBE1_CH02 RBE1_CH03 RBE1_CH04 RBE1_CH05 RBE1_CH06 RBE1_CH07 RBE1_CH08 RG1_CH01 RG1_CH02 RG1_CH03 RG1_CH04 RG1_CH05 RG1_CH06 RG1_CH07 RG1_CH08 RGS1_CH01 RGS1_CH02 RGS1_CH03 RGS1_CH04 RGS1_CH05 RGS1_CH06 RGS1_CH07 RGS1_CH08 RPWM1_CH01 RPWM1_CH02 RPWM1_CH03 RPWM1_CH04 RPWM1_CH05 RPWM1_CH06 RPWM1_CH07 RPWM1_CH08 RTCO1_CH01 RTCO1_CH02 RTCO1_CH03 RTCO1_CH04 RTCO1_CH05 RTCO1_CH06 RTCO1_CH07 RTCO1_CH08 RTIN1_CH01 RTIN1_CH02 RTIN1_CH03 RTIN1_CH04 RTIN1_CH05 RTIN1_CH06 RTIN1_CH07 RTIN1_CH08 RTPD1_CH01 RTPD1_CH02 RTPD1_CH03 RTPD1_CH04 RTPD1_CH05 RTPD1_CH06 RTPD1_CH07 RTPD1_CH08 RTPU1_CH01 RTPU1_CH02 RTPU1_CH03 RTPU1_CH04 RTPU1_CH05 RTPU1_CH06 RTPU1_CH07 RTPU1_CH08: library part Resistor
RLED1 RLED3: library part RES_330k_1%
RLED2: library part RES_220k_1%
RLED4: library part RES_240k_1%
RLED5: library part RES_2.2M_1%
RPWR1: library part RES_220R
RPWR2: library part RES_3.3k
RPWR3: library part RES_100k
RTEMP1: library part RES_4.7k
SJ1_CH01 SJ1_CH02 SJ1_CH03 SJ1_CH04 SJ1_CH05 SJ1_CH06 SJ1_CH07 SJ1_CH08: library part SolderJumper_Open_2
U1: library part ESP32-S3-DEVKITC-1-N16R8V
U2: library part CUSTOM_SN74AHCT245

## Via types
v1: diameter 0.6, hole 0.3, Top Layer to Bottom Layer, 228 vias
v2: diameter 0.5, hole 0.25, Top Layer to Bottom Layer, 3 vias
v3: diameter 0.9, hole 0.45, Top Layer to Bottom Layer, 2 vias

## Nets (pads, with @x,y where several pads share a name; then routed paths per layer and width w, separated by ;. In a path a pad name is that pad's centre, name@x,y a point inside that pad or via, vN(x,y) a via of type N, cw(c..) or ccw(c..) an arc to the next point about the centre after c; other vN are vias at no path point)
+3V3_AUX: CLED1.1 CTEMP1.1 DTPU1_CH01.2 DTPU1_CH02.2 DTPU1_CH03.2 DTPU1_CH04.2 DTPU1_CH05.2 DTPU1_CH06.2 DTPU1_CH07.2 DTPU1_CH08.2 JTEMP1.3 RLED5.1 RPWR1.1 RTCO1_CH01.1 RTCO1_CH02.1 RTCO1_CH03.1 RTCO1_CH04.1 RTCO1_CH05.1 RTCO1_CH06.1 RTCO1_CH07.1 RTCO1_CH08.1 RTEMP1.1 U1.J1_1 ULED1.5 | length 322.1
  Top Layer w0.18: 53.3,68.925 54.075,68.925
  Top Layer w0.19: 71.134,46.592 71.468,46.592 71.673,46.387 ; 106.065,72.072 106.065,72.383 106.351,72.669 ; 111.44,73.322 111.569,73.193 111.569,71.343
  Top Layer w0.254: RTCO1_CH01.1@39.2,44.6 39.2,45.309 36.366,48.143 36.366,54.097 39.269,57 RPWR1.1@40.55,57 41.297,57.747 46.344,57.747 ; RTCO1_CH05.1@40.6,76.05 41.309,76.05 43.665,73.694 49.235,73.694 ; RLED5.1@51.05,53.75 50.341,53.75 ; 53.3,68.925 53.3,71.73 JTEMP1.3@54.25,72.68 ; CLED1.1@57.55,57 57.55,56.169 56.68,55.299 ; RTCO1_CH02.1@63.4,44.6 65.632,46.832 67.619,46.832 68.388,47.6 70.655,47.6 70.655,47.071 71.134,46.592 ; v1(65.332,48.662) 61.324,48.662 59.783,50.203 59.783,50.998 56.68,54.101 56.68,55.299 ; 71.673,46.387 71.673,45.864 72.937,44.6 86.891,44.6 ; RTCO1_CH03.1@87.6,44.6 86.891,44.6 ; RTCO1_CH07.1@89,76.05 89,75.138 ; v1(93.868,45.697) 88.514,45.697 88.04,45.222 87.556,45.222 87.515,45.222 87.345,45.052 87.343,45.052 86.891,44.6 ; v1(95.997,44.623) 108.622,44.623 108.795,44.796 ; v1(98.86,49.247) 107.66,49.247 108.795,48.111 108.795,44.796 ; 106.065,72.072 105.829,71.837 99.464,71.837 99.252,72.049 98.768,72.049 98.558,71.838 91.897,71.838 91.111,72.624 91.111,73.35 89.323,75.138 89,75.138 ; 106.351,72.669 106.351,73.4 107.087,74.136 110.742,74.136 111.44,73.438 111.44,73.322 ; 111.569,71.343 112.683,71.343 113.867,72.526 113.867,75.737 RTCO1_CH08.1@113.554,76.05 ; RTCO1_CH04.1@111.8,44.6 111.091,44.6 110.895,44.796 108.795,44.796 ; RTCO1_CH08.1@113.2,76.05 RTCO1_CH08.1@113.554,76.05 ; v1(114.099,76.05) RTCO1_CH08.1@113.554,76.05 ; 46.344,57.747 50.341,53.75 ; 46.344,57.747 49.8,61.204 49.8,69.209 49.235,69.773 49.235,73.694 ; 49.235,73.694 53.236,73.694 JTEMP1.3@54.25,72.68 ; 50.341,53.75 51.89,55.299 56.68,55.299 ; JTEMP1.3@54.25,72.68 61.43,72.68 RTCO1_CH06.1@64.8,76.05 65.509,76.05 66.593,74.966 88.828,74.966 89,75.138
  Bottom Layer w0.19: 51.947,65.77 52.083,65.906 52.18,65.906 ; 52.372,66.644 52.372,66.771 52.453,66.852 ; 71.582,50.027 71.582,51.087 72.003,51.507
  Bottom Layer w0.254: DTPU1_CH01.2@39.675,61.5 40.269,60.906 45.23,60.906 47.277,62.953 50.624,62.953 51.203,63.531 51.203,64.909 ; DTPU1_CH05.2@47.275,64.15 48.009,64.15 48.768,64.909 51.203,64.909 ; 51.947,65.77 51.203,65.026 51.203,64.909 ; 52.18,65.906 52.372,66.098 52.372,66.644 ; 52.453,66.852 52.453,70.883 JTEMP1.3@54.25,72.68 ; v1(65.332,48.662) 68.957,48.662 U1.J1_1@69.521,48.098 ; U1.J1_1@69.521,47.6 U1.J1_1@69.521,48.098 ; DTPU1_CH06.2@71.475,64.15 71.475,58.916 73.891,56.5 DTPU1_CH02.2@74.625,56.5 74.625,54.13 72.003,51.507 ; 71.582,50.027 70.289,48.734 69.521,48.734 U1.J1_1@69.521,48.098 ; v1(93.868,45.697) 94.924,45.697 v1(95.997,44.623) ; DTPU1_CH07.2@95.675,64.15 96.409,64.15 98.091,62.467 98.091,56.5 DTPU1_CH03.2@98.825,56.5 98.825,49.281 v1(98.86,49.247) ; v1(114.099,76.05) 114.099,69.928 119.141,64.886 119.141,64.15 DTPU1_CH08.2@119.875,64.15 119.875,58.916 122.291,56.5 DTPU1_CH04.2@123.025,56.5
+3V3_CTRL: 
+5V: C1.1 JA1_CH01.1 JA1_CH02.1 JA1_CH03.1 JA1_CH04.1 JA1_CH05.1 JA1_CH06.1 JA1_CH07.1 JA1_CH08.1 JPOWER1.7 JPOWER1.8 JPOWER1.9 U2.1 U2.20 | length 280.7
  Top Layer w0.337: 31.678,58.44 32.485,58.44 32.875,58.83 JPOWER1.7@34,58.83
  Top Layer w0.45: 31.678,58.44 29.26,56.022 29.26,37.641 32.416,34.486 47.746,34.486 JA1_CH01.1@49.06,35.8 52.549,35.8 53.831,34.518 74.542,34.518 ; JPOWER1.9@34,61.37 32.818,61.37 29.292,64.896 29.292,82.475 31.668,84.85 JA1_CH05.1@41.44,84.85 42.734,86.144 63.064,86.144 64.358,84.85 JA1_CH06.1@65.64,84.85 66.947,86.157 87.251,86.157 88.558,84.85 JA1_CH07.1@89.84,84.85 91.196,86.206 111.402,86.206 112.758,84.85 JA1_CH08.1@114.04,84.85 ; JA1_CH02.1@73.26,35.8 74.542,35.8 74.542,34.518 ; JA1_CH04.1@121.66,35.8 120.378,34.518 100.023,34.518 98.742,35.8 JA1_CH03.1@97.46,35.8 96.178,34.518 74.542,34.518
  Bottom Layer w0.35: 73.63,81.212 75.618,79.225 75.618,74.654
  Bottom Layer w0.45: JPOWER1.7@34,58.83 JPOWER1.9@34,61.37 ; JA1_CH06.1@65.64,84.85 69.278,81.212 73.63,81.212 ; 75.618,74.654 75.871,74.401 75.871,65.901 78.278,63.495 80.812,63.495 81.575,62.732 ; U2.20@81.575,55.95 81.575,57.132 81.499,57.207 81.499,60.293 81.575,60.368 81.575,62.732 ; C1.1@83.075,64.25 83.075,63.443 82.287,63.443 81.575,62.732
+12V: C12B.1 CIN1_CH01.1 CIN1_CH02.1 CIN1_CH03.1 CIN1_CH04.1 CIN1_CH05.1 CIN1_CH06.1 CIN1_CH07.1 CIN1_CH08.1 DZ1_CH01.1 DZ1_CH02.1 DZ1_CH03.1 DZ1_CH04.1 DZ1_CH05.1 DZ1_CH06.1 DZ1_CH07.1 DZ1_CH08.1 JPOWER1.13 JPOWER1.14 JPOWER1.15 QH1_CH01.1 QH1_CH01.2 QH1_CH01.3 QH1_CH02.1 QH1_CH02.2 QH1_CH02.3 QH1_CH03.1 QH1_CH03.2 QH1_CH03.3 QH1_CH04.1 QH1_CH04.2 QH1_CH04.3 QH1_CH05.1 QH1_CH05.2 QH1_CH05.3 QH1_CH06.1 QH1_CH06.2 QH1_CH06.3 QH1_CH07.1 QH1_CH07.2 QH1_CH07.3 QH1_CH08.1 QH1_CH08.2 QH1_CH08.3 RGS1_CH01.1 RGS1_CH02.1 RGS1_CH03.1 RGS1_CH04.1 RGS1_CH05.1 RGS1_CH06.1 RGS1_CH07.1 RGS1_CH08.1 | length 413.3
  Top Layer w0.59: JPOWER1.15@34,68.99 35.252,68.99 35.662,69.4 C12B.1@39.3,69.4
  Bottom Layer w0.442: 26.11,52.916 26.11,53.443 26.328,53.661 ; 35.525,77.85 35.525,76.262 36.936,74.851 ; 43.602,57.078 44.549,58.025 48.083,58.025 ; 49.75,59.95 50.752,59.95 51.5,60.698 ; 53.999,45.461 54.377,45.083 ; 78.722,61.445 78.722,61.673 CIN1_CH07.1@79.082,62.032 ; 87.583,54.611 87.78,54.611 87.869,54.7 ; 103.098,76.695 103.618,77.215 QH1_CH08.3@106.9,77.215 ; QH1_CH08.1@106.9,79.755 106.9,80.433 107.012,80.545 109.575,80.545 ; 122.287,77.305 122.327,77.265 122.327,76.737 ; 123.925,55.514 123.925,61.489 123.91,61.504 123.91,62.066 123.925,62.081 123.925,63.612 124.284,63.971 ; 124.028,73.928 124.028,73.672 124.439,73.261
  Bottom Layer w0.59: 26.11,52.916 27.673,51.352 27.673,43.435 QH1_CH01.3@28.9,43.435 QH1_CH01.1@28.9,40.895 ; 26.328,53.661 26.328,54.351 29.5,57.523 29.5,59.973 30.9,61.373 30.9,63.127 32.748,64.975 32.748,66.45 JPOWER1.13@34,66.45 34,69.942 32.437,71.505 32.437,76.579 33.073,77.215 QH1_CH05.3@34.3,77.215 34.3,77.85 ; QH1_CH05.1@34.3,79.755 34.3,77.85 ; 35.525,77.85 34.3,77.85 ; RGS1_CH01.1@36.7,56.5 36.7,57.452 38.736,57.452 ; 36.936,74.851 39.7,72.088 RGS1_CH05.1@39.7,64.15 ; 43.602,57.078 43.025,56.5 DZ1_CH01.1@41.725,56.5 40.773,57.452 38.736,57.452 ; DZ1_CH05.1@45.375,64.15 44.473,64.15 43.528,65.095 41.542,65.095 40.952,64.504 40.952,64.15 RGS1_CH05.1@39.7,64.15 ; 48.083,58.025 48.107,58.048 48.5,58.048 RGS1_CH02.1@48.5,59 48.701,59.201 RGS1_CH02.1@49.155,59.201 ; 49.75,59.95 49.155,59.355 RGS1_CH02.1@49.155,59.201 ; RGS1_CH06.1@51.5,61.65 51.5,60.698 52.568,60.698 53.497,59.77 ; CIN1_CH02.1@53.7,58.4 53.7,59.567 53.497,59.77 ; 53.999,45.461 53.999,47.975 54.773,48.75 DZ1_CH02.1@55.675,48.75 ; 54.377,45.083 54.327,45.032 54.327,43.435 QH1_CH02.3@53.1,43.435 ; QH1_CH06.1@58.5,79.755 QH1_CH06.3@58.5,77.215 59.727,77.215 59.727,71.9 ; QH1_CH03.3@77.3,43.435 77.3,37.876 ; 78.722,61.445 78.65,61.373 77.176,61.373 76.798,60.995 ; CIN1_CH07.1@79.082,62.032 CIN1_CH07.1@79.3,62.25 ; QH1_CH07.3@82.7,77.215 QH1_CH07.1@82.7,79.564 ; QH1_CH07.1@82.7,79.755 QH1_CH07.1@82.7,79.564 ; RGS1_CH03.1@85,53.35 85,54.302 ; 87.583,54.611 85.309,54.611 85,54.302 ; 87.869,54.7 88.558,55.389 88.558,55.87 89.076,56.388 90.278,56.388 DZ1_CH03.1@90.39,56.5 ; RGS1_CH07.1@88.1,64.15 89.352,64.15 89.352,63.8 89.935,63.217 90.261,63.217 ; DZ1_CH03.1@90.625,56.5 DZ1_CH03.1@90.39,56.5 ; QH1_CH04.3@101.5,43.435 101.5,40.143 98.688,37.332 77.844,37.332 77.3,37.876 ; CIN1_CH04.1@102.1,58.4 102.1,59.162 ; 103.098,76.695 103.098,75.796 102.475,75.174 100.532,75.174 100.157,75.548 100.157,77.012 97.604,79.564 QH1_CH07.1@82.7,79.564 ; QH1_CH08.3@106.9,77.215 QH1_CH08.1@106.9,79.755 ; RGS1_CH04.1@109.3,56.5 109.3,57.194 ; 109.575,80.545 120.859,80.545 122.287,79.116 122.287,77.305 ; RGS1_CH08.1@112.3,64.15 113.236,65.086 115.517,65.086 116.529,64.074 ; DZ1_CH04.1@114.825,56.5 114.825,57.427 ; DZ1_CH08.1@117.975,64.15 116.605,64.15 116.529,64.074 ; 122.327,76.737 122.327,75.426 123.826,73.928 124.028,73.928 ; 123.925,55.514 119.275,55.514 118.925,55.864 118.925,57.114 118.612,57.427 114.825,57.427 ; 124.284,63.971 124.284,73.107 124.439,73.261 ; 38.736,57.452 38.736,62.235 39.7,63.198 RGS1_CH05.1@39.7,64.15 ; RGS1_CH02.1@49.155,59.201 52.477,55.88 52.477,50.587 51.873,49.984 51.873,43.435 QH1_CH02.3@53.1,43.435 ; QH1_CH02.3@53.1,43.435 53.1,37.895 53.643,37.352 76.776,37.352 77.3,37.876 ; 53.497,59.77 55.1,61.373 55.1,63.127 58.825,66.852 DZ1_CH06.1@58.825,71.9 59.727,71.9 ; 59.727,71.9 59.892,71.735 68.234,71.735 69.233,70.736 69.233,68.621 72.748,65.107 72.748,64.405 76.159,60.995 76.798,60.995 ; 76.798,60.995 76.798,59.611 77.133,59.277 77.9,59.277 77.9,57.523 78.563,57.523 79.961,56.125 79.961,56.043 81.367,54.638 84.664,54.638 85,54.302 ; 90.261,63.217 90.261,57.581 90.39,57.451 DZ1_CH03.1@90.39,56.5 ; 90.261,63.217 91.449,63.217 92.383,64.15 94.677,64.15 94.677,64.742 95.017,65.082 96.313,65.082 101.341,60.055 101.341,59.602 101.781,59.162 102.1,59.162 ; 102.1,59.162 102.404,59.162 103.5,60.258 CIN1_CH08.1@103.5,62.25 104.377,62.25 104.377,61.94 109.123,57.194 109.3,57.194 ; 109.3,57.194 109.3,57.452 114.78,57.452 ; 114.78,57.452 114.805,57.427 114.825,57.427 ; 114.78,57.452 114.78,62.325 116.529,64.074
ARGB_BUFFERED_CH01: R1_CH01.1 SJ1_CH01.2 U2.18 | length 71.2
  Top Layer w0.155: R1_CH01.1@47.2,41.8 47.859,41.8 47.859,42.294 48.078,42.513 53.222,42.513 56.032,39.703 56.032,38.63 56.032,38.411 56.923,37.52 57.142,37.52 57.558,37.52 58.163,36.915 63.663,36.915 66.113,39.365 69.587,39.365 v1(69.878,39.656) ; v1(77.011,58.026) 77.835,58.85 v1(82.359,58.85) 82.733,59.224 82.733,60.306 82.531,60.508 81.593,60.508 v1(80.892,61.209)
  Bottom Layer w0.155: v1(69.878,39.656) 71.437,39.656 75.797,44.016 80.764,44.016 80.764,48.055 80.292,48.528 80.292,48.534 80.143,48.683 80.052,48.683 79.106,49.63 78.185,49.63 77.178,50.637 77.178,50.856 77.056,50.978 77.056,57.981 v1(77.011,58.026) ; SJ1_CH01.2@79.425,60.3 79.425,61.009 80.692,61.009 v1(80.892,61.209) ; v1(82.359,58.85) 82.359,57.556 82.875,57.04 U2.18@82.875,55.95
ARGB_BUFFERED_CH02: R1_CH02.1 SJ1_CH02.2 U2.17 | length 24.7
  Top Layer w0.155: R1_CH02.1@71.4,41.8 71.4,42.459 71.963,43.022 v1(71.963,43.394) ; v1(76.336,52.012) 78.443,52.012 83.421,56.99 v1(83.421,57.226)
  Bottom Layer w0.155: v1(71.963,43.394) 73.115,44.547 73.115,46.313 72.756,46.672 72.756,46.763 73.16,47.168 73.16,48.157 74.076,49.072 74.076,49.751 v1(76.336,52.012) ; v1(79.99,53.559) 80.081,53.65 SJ1_CH02.2@81.375,53.65 ; v1(83.421,57.226) 83.525,57.122 U2.17@83.525,55.95
ARGB_BUFFERED_CH03: R1_CH03.1 SJ1_CH03.2 U2.16 | length 42.9
  Top Layer w0.155: v1(84.05,67.187) 84.05,61.634 85.011,60.673 v1(85.011,60.126) 85.247,60.126 86.252,59.121 86.252,58.801 88.526,56.527 89.184,56.527 92.732,52.979 v1(92.732,51.712) ; v1(93.8,42.1) 94.1,41.8 R1_CH03.1@95.6,41.8
  Bottom Layer w0.155: SJ1_CH03.2@83.125,66.25 83.125,66.959 83.822,66.959 v1(84.05,67.187) ; U2.16@84.175,55.95 84.175,59.29 v1(85.011,60.126) ; v1(92.732,51.712) 91.222,50.202 91.222,46.728 90.159,45.665 90.159,43.605 90.337,43.427 90.505,43.259 90.505,41.714 90.505,41.495 90.634,41.366 93.147,41.366 93.8,42.019 v1(93.8,42.1)
ARGB_BUFFERED_CH04: R1_CH04.1 SJ1_CH04.2 U2.15 | length 53.3
  Top Layer w0.155: v1(84.719,57.209) 87.795,54.133 87.795,54.045 ; v1(86.73,52.98) 87.795,54.045 ; v1(109.423,50.531) 91.309,50.531 87.795,54.045 ; v1(114.466,41.8) R1_CH04.1@119.8,41.8
  Bottom Layer w0.155: SJ1_CH04.2@81.375,51.9 81.375,51.191 84.942,51.191 v1(86.73,52.98) ; v1(84.719,57.209) 84.825,57.104 U2.15@84.825,55.95 ; v1(109.423,50.531) 111.602,48.352 111.602,47.168 112.007,46.763 112.007,46.672 114.466,44.213 v1(114.466,41.8)
ARGB_BUFFERED_CH05: R1_CH05.1 SJ1_CH05.2 U2.14 | length 62.9
  Top Layer w0.155: R1_CH05.1@48.6,78.85 49.259,78.85 53.953,74.156 v1(62.06,74.156) ; v1(64.177,74.084) 72.56,74.084 72.717,73.928 72.989,73.656 73.487,73.158 73.487,72.538 74.171,71.853 84.597,71.853 84.816,71.853 84.856,71.813 v1(85.744,71.813) ; v1(85.264,58.849) 85.091,58.849 84.07,59.87 84.07,60.731 83.181,61.621 83.181,68.313 84.282,69.414 v1(85.666,69.414)
  Bottom Layer w0.155: v1(62.06,74.156) 64.104,74.156 v1(64.177,74.084) ; v1(85.264,58.849) 85.475,58.639 U2.14@85.475,55.95 ; v1(85.666,69.414) v1@85.892,69.414 ; v1(85.744,71.813) 85.892,71.665 v1@85.892,69.414 ; SJ1_CH05.2@86.625,66.25 85.892,66.983 v1@85.892,69.414
ARGB_BUFFERED_CH06: R1_CH06.1 SJ1_CH06.2 U2.13 | length 63.9
  Top Layer w0.155: R1_CH06.1@72.8,78.85 73.459,78.85 77.688,83.079 91.748,83.079 94.523,80.304 v1(94.523,77.071) ; v1(88.908,62.635) 90.227,61.316 91.412,61.316 93.147,63.05 v1(93.147,66.236)
  Bottom Layer w0.155: U2.13@86.125,55.95 86.125,57.028 88.702,59.605 88.702,60.376 88.596,60.481 88.596,62.323 v1(88.908,62.635) ; SJ1_CH06.2@89.85,54.425 90.273,54.848 90.273,55.171 90.895,55.792 91.31,55.792 91.31,57.897 90.796,58.411 90.796,61.071 v1(91.04,61.316) ; v1(93.147,66.236) 93.147,71.737 93.822,72.412 93.822,72.445 93.822,76.37 v1(94.523,77.071)
ARGB_BUFFERED_CH07: R1_CH07.1 SJ1_CH07.2 U2.12 | length 32.4
  Top Layer w0.155: v1(88.255,58.359) 91.904,58.359 98.012,64.466 v1(98.012,64.923) ; R1_CH07.1@97,78.85 97,78.191 v1(97.246,77.944)
  Bottom Layer w0.155: U2.12@86.775,55.95 86.775,56.984 86.881,56.984 v1(88.255,58.359) ; v1(93.286,59.741) 93.691,60.146 93.691,60.375 SJ1_CH07.2@94.4,60.375 ; v1(97.246,77.944) 98.608,76.583 98.608,71.819 98.476,71.686 98.476,71.244 98.74,70.98 98.74,65.652 v1(98.012,64.923)
ARGB_BUFFERED_CH08: R1_CH08.1 SJ1_CH08.2 U2.11 | length 62.1
  Top Layer w0.155: v1(88.249,57.574) 87.716,58.107 87.716,58.575 88.429,59.288 91.665,59.288 v1(92.26,59.882) 92.26,59.954 101.81,69.505 v1(116.084,69.505) ; v1(118,77.195) 119.381,77.195 120.541,78.356 120.541,78.85 R1_CH08.1@121.2,78.85
  Bottom Layer w0.155: U2.11@87.425,55.95 87.425,56.984 87.659,56.984 v1(88.249,57.574) ; SJ1_CH08.2@91.6,54.425 92.309,54.425 92.309,56.868 93.399,57.957 95.035,57.957 95.183,58.105 95.183,61.058 94.944,61.297 94.725,61.297 94.505,61.297 94.415,61.388 93.765,61.388 v1(92.26,59.882) ; v1(116.084,69.505) 116.479,69.9 116.479,72.771 116.698,72.99 116.698,74.156 118,75.458 v1(118,77.195)
ARGB_DATA_CH01: SJ1_CH01.1 U1.J3_4 U2.2 | length 21.5
  Top Layer w0.155: v1(78.56,64.176) 78.56,62.53 81.116,59.974 v1(82.199,59.974)
  Bottom Layer w0.155: U1.J3_4@77.141,73 76.888,72.747 76.888,67.449 77.261,67.076 77.776,67.076 78.56,66.292 v1(78.56,64.176) ; SJ1_CH01.1@77.875,60.3 78.609,59.566 80.142,59.566 80.7,60.124 v1(80.7,60.39) ; v1(82.199,59.974) 82.225,60 U2.2@82.225,61.55
ARGB_DATA_CH02: SJ1_CH02.1 U1.J3_5 U2.3 | length 39.4
  Top Layer w0.155: v1(80.374,68.569) 77.685,68.569 76.923,67.807 76.923,66.723 79.115,64.532 79.115,64.218 82.513,60.82 82.66,60.82 83.044,60.435 83.044,59.099 84.185,57.959 84.185,53.104 v1(84.912,52.377)
  Bottom Layer w0.155: U1.J3_5@79.681,73 80.374,72.308 80.374,67.525 82.905,64.993 83.528,64.993 83.751,64.77 83.751,63.461 82.875,62.584 U2.3@82.875,61.55 ; SJ1_CH02.1@82.925,53.65 82.925,52.941 83.551,52.941 83.875,52.617 84.672,52.617 v1(84.912,52.377)
ARGB_DATA_CH03: SJ1_CH03.1 U1.J3_10 U2.4 | length 18
  Top Layer w0.155: v1(84.805,65.295) 84.805,65.709 89.171,70.075 v1(92.077,70.075)
  Bottom Layer w0.155: U2.4@83.525,61.55 83.525,62.584 84.064,63.124 84.064,64.93 v1@84.675,65.541 ; SJ1_CH03.1@84.675,66.25 v1@84.675,65.541 ; v1(84.805,65.295) 84.675,65.425 v1@84.675,65.541 ; v1(92.077,70.075) 92.381,70.379 U1.J3_10@92.381,73
ARGB_DATA_CH04: SJ1_CH04.1 U1.J3_9 U2.5 | length 46.8
  Top Layer w0.155: v1(79.081,55.919) 79.081,57.448 ; v1(83.377,57.998) 82.827,57.448 79.081,57.448 ; v1(89.758,70.609) 79.234,70.609 76.468,67.843 76.468,57.811 76.831,57.448 79.081,57.448
  Bottom Layer w0.155: v1(79.081,55.919) 78.641,55.479 78.641,54.144 80.176,52.609 80.542,52.609 82.216,52.609 SJ1_CH04.1@82.925,51.9 ; v1(83.377,57.998) 83.377,59.718 84.175,60.516 U2.5@84.175,61.55 ; v1(89.758,70.609) 89.758,72.916 U1.J3_9@89.841,73
ARGB_DATA_CH05: SJ1_CH05.1 U1.J3_8 U2.6 | length 13.9
  Bottom Layer w0.155: U2.6@84.825,61.55 84.825,62.584 85.604,62.584 86.345,63.325 86.345,64.109 87.777,65.541 88.175,65.541 88.175,66.959 87.301,67.833 U1.J3_8@87.301,73